# Altium PCB A313_3.PcbDoc (part 2 of 3)
Units mm, origin at the board's own origin, x right, y up, seen from the top; angles counter-clockwise.
Board outline 230.01 x 157.01 mm, 2 copper layers (Top Layer, Bottom Layer); 198 components, 173 nets, 1021 pads, 579 vias.
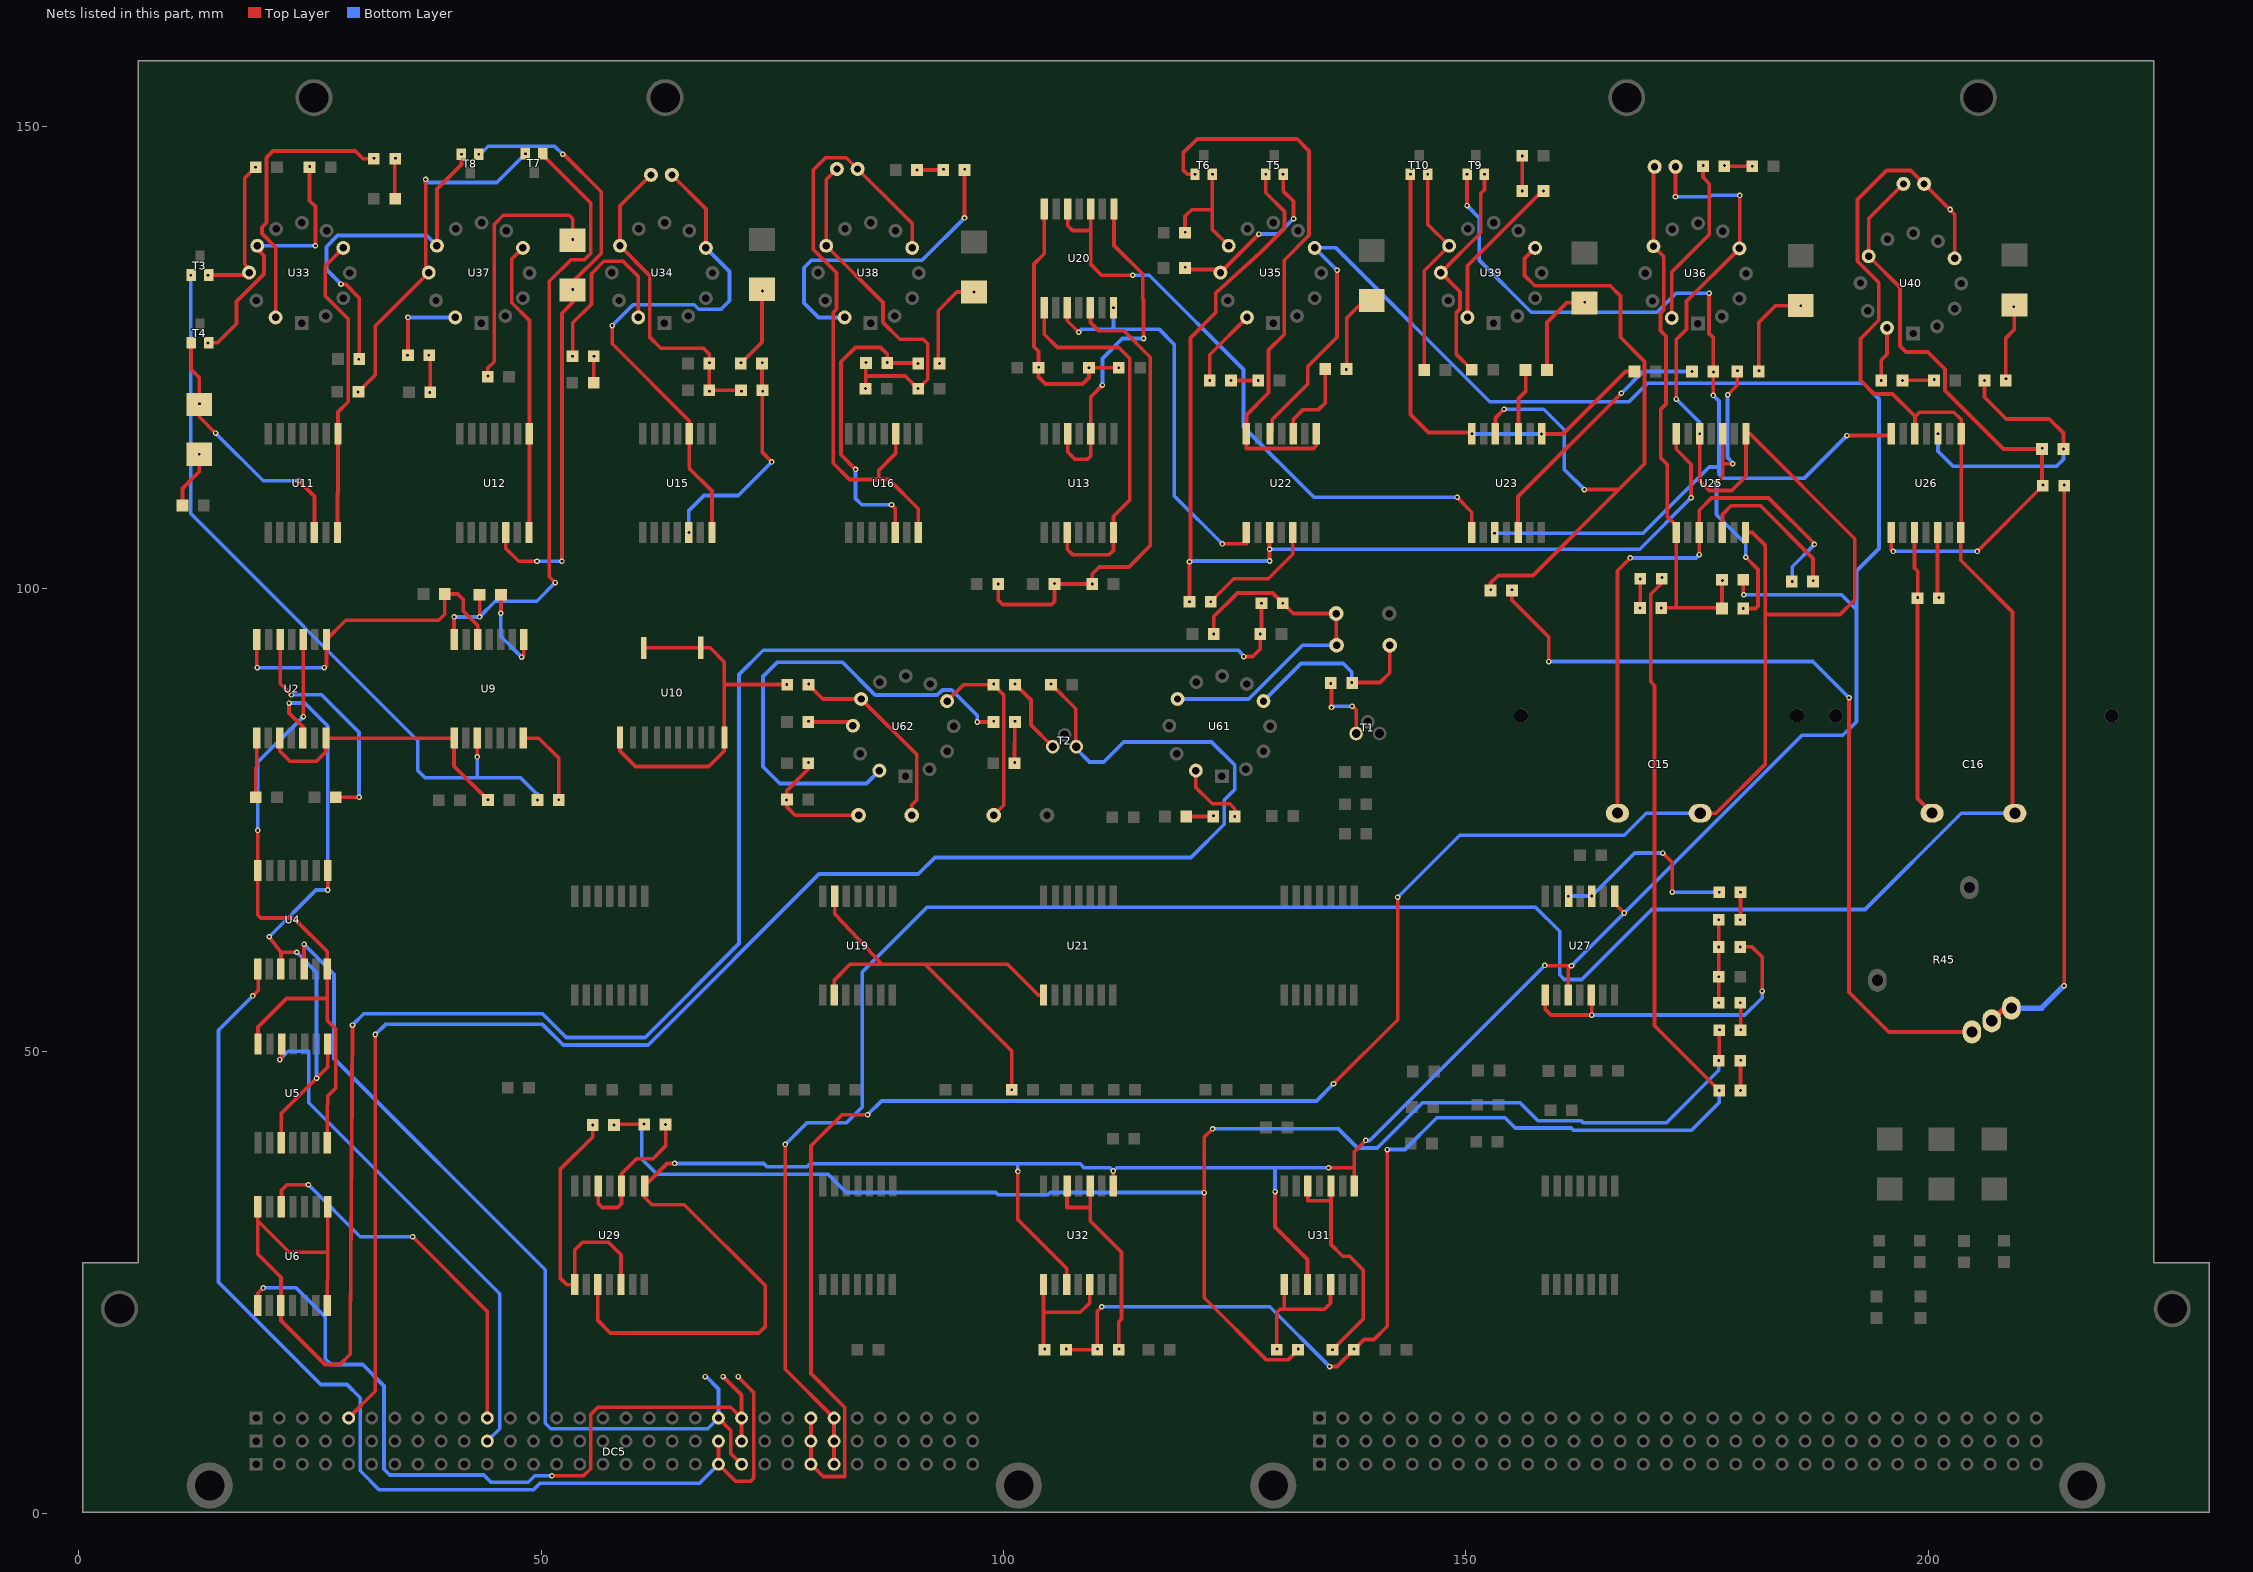
[diagram p2: the nets of this part, all layers, seen from the top]

## Via types
v1: diameter 0.6, hole 0.3, Top Layer to Bottom Layer, 579 vias

## Nets (pads, with @x,y where several pads share a name; then routed paths per layer and width w, separated by ;. In a path a pad name is that pad's centre, name@x,y a point inside that pad or via, vN(x,y) a via of type N, cw(c..) or ccw(c..) an arc to the next point about the centre after c; other vN are vias at no path point) (continued)
Bhod_c3b: DC5.B11 U5.12 | length 56.6
  Top Layer w0.4: v1(21.722,49.084) 21.925,49.287 U5.12@21.925,50.775
  Bottom Layer w0.4: v1(21.722,49.084) 22.637,49.999 24.872,49.999 24.872,44.417 45.521,23.768 45.521,9.171 DC5.B11@44.175,7.825
Bhod_c3rc: DC5.C11 U6.12 | length 41.5
  Top Layer w0.4: U6.12@21.907,33.175 21.907,34.957 22.5,35.55 v1(24.825,35.55) ; v1(36.099,29.933) 44.175,21.857 DC5.C11@44.175,10.325
  Bottom Layer w0.4: v1(24.825,35.55) 30.442,29.933 v1(36.099,29.933)
Bhod_rc: DC5.B22 DC5.C22 U6.1 | length 85.6
  Top Layer w0.4: U6.1@19.357,22.5 19.357,23.808 v1(19.944,24.396) ; v1(51.161,4.076) 54.59,4.076 55.352,4.838 55.352,10.705 56.139,11.492 70.508,11.492 DC5.C22@71.675,10.325 ; v1(69.675,14.8) 71.675,12.8 DC5.C22@71.675,10.325 ; DC5.B22@71.675,7.825 DC5.C22@71.675,10.325
  Bottom Layer w0.4: v1(19.944,24.396) 23.5,24.396 26.65,21.246 26.65,16.738 27.285,16.103 30.697,16.103 33,13.8 33,4.787 33.635,4.152 43.802,4.152 44.582,3.371 48.596,3.371 49.3,4.076 v1(51.161,4.076)
Bhoda: DC5.A21 DC5.B21 U4.1 | length 123.7
  Top Layer w0.4: v1(18.801,55.968) 19.398,56.565 19.398,57.817 19.357,57.817 U4.1@19.357,58.875 ; DC5.B21@69.175,7.825 DC5.A21@69.175,5.325 71,3.5 72.675,3.5 73,3.825 73,13.075 v1@71.325,14.75
  Bottom Layer w0.4: v1(18.801,55.968) 15.1,52.266 15.1,25.01 26.162,13.949 28.994,13.949 30.435,12.508 30.435,4.609 32.473,2.571 49.174,2.571 49.874,3.271 67.121,3.271 DC5.A21@69.175,5.325
  other v1: 71.325,14.8
Bhodb: DC5.A22 DC5.C21 U4.5 | length 95.8
  Top Layer w0.4: U4.5@24.357,58.875 v1(24.357,61.556) ; DC5.C21@69.175,10.325 70.516,8.984 70.516,6.484 DC5.A22@71.675,5.325
  Bottom Layer w0.4: v1(24.357,61.556) 27.591,58.321 27.591,49.206 50.45,26.347 50.45,9.75 51.044,9.156 68.006,9.156 DC5.C21@69.175,10.325 69.175,13.475 v1@67.85,14.8
  other v1: 67.75,14.8
int.a: C15.2 C34.1 DC5.A25 DC5.B25 DC5.C25 U25.7 U25.8 U25.12 U36.5 | length 290.1
  Top Layer w0.4: DC5.C25@79.175,10.325 DC5.A25@79.175,5.325 80.501,3.999 82.835,3.999 82.835,11.467 79.175,15.127 79.175,39.76 82.53,43.115 v1(85.299,43.115) ; v1(135.692,46.468) 142.626,53.402 v1(142.626,66.636) ; v1(172.675,142.4) C34.1@172.675,145.65 ; v1(172.75,120.525) 172.75,126.96 173.868,128.078 173.868,131.093 U36.5@179.593,136.818 179.55,136.86 179.625,136.935 v1(179.625,142.55) ; v1(175.3,116.775) 175.3,111.67 176.341,110.629 178.754,110.629 180.3,112.175 U25.8@180.3,116.775 180.725,116.775 192.075,105.425 192.075,98.825 190.475,97.225 182.45,97.225 182.4,97.275 ; C15.2@175.35,75.725 177.069,75.725 182.4,81.056 182.4,97.275 ; U25.7@180.25,106.1 180.975,106.1 182.4,104.675 182.4,97.275
  Bottom Layer w0.4: v1(85.299,43.115) 86.797,44.614 133.838,44.614 v1(135.692,46.468) ; v1(142.626,66.636) 149.341,73.35 167.146,73.35 169.521,75.725 C15.2@175.35,75.725 ; v1(172.675,142.4) 176.4,142.4 176.55,142.55 v1(179.625,142.55) ; v1(172.75,120.525) 175.3,117.975 v1(175.3,116.775)
int.b: C16.2 C40.1 DC5.A26 DC5.B26 DC5.C26 U26.7 U26.8 U26.12 U40.5 | length 302.3
  Top Layer w0.4: v1(76.409,39.915) 76.409,15.591 DC5.C26@81.675,10.325 DC5.A26@81.675,5.325 ; U26.12@198.572,116.775 198.572,118.601 ; U40.5@202.865,135.743 202.865,140.51 198.126,145.249 195.509,145.249 192.36,142.099 192.36,135.428 194.671,133.117 194.671,129.049 192.68,127.058 192.68,122.545 194.15,121.075 196.152,121.075 198.572,118.655 198.572,118.601 ; C16.2@209.377,75.725 209.124,75.725 209.124,97.484 203.522,103.085 U26.7@203.522,106.1 203.572,106.15 203.572,118.303 202.775,119.1 199.072,119.1 198.572,118.601
  Bottom Layer w0.4: v1(76.409,39.915) 78.745,42.252 83.013,42.252 84.74,43.979 84.74,58.598 91.717,65.575 157.53,65.575 160.15,62.955 160.15,58.252 160.652,57.75 162.544,57.75 170.109,65.315 193.172,65.315 203.582,75.725 C16.2@209.377,75.725
  other v1: 202.375,141.025
ip: DC5.C5 R28.1 T2.3 | length 180.4
  Top Layer w0.4: DC5.C5@29.175,10.325 32.06,13.21 v1(32.06,51.802) ; v1(105.15,89.7) 107.825,87.025 107.825,82.975 T2.3@107.87,82.93
  Bottom Layer w0.4: v1(32.06,51.802) 33.152,52.894 50.157,52.894 52.379,50.672 61.576,50.672 80.055,69.15 90.785,69.15 92.588,70.954 120.279,70.954 123.875,74.55 123.875,77.175 125,78.3 125,80.935 122.51,83.425 113.01,83.425 110.851,81.266 109.3,81.266 107.87,82.696 T2.3@107.87,82.93
NetC4_2: C4.2 R5.2 U6.3 U6.7 U6.8 U6.14 | length 218.2
  Top Layer w0.4: U6.14@19.357,33.175 19.357,31.66 ; U6.7@26.857,22.5 26.907,27.849 26.907,28.25 ; U6.8@26.907,33.175 26.907,28.25 ; v1(29.596,52.818) 29.347,19.544 29.347,17.219 28.231,16.103 26.619,16.103 21.857,20.865 21.857,25.55 19.357,28.05 19.357,31.66 ; v1(125.995,92.677) 126.952,92.677 127.768,93.493 v1(127.768,95.125) ; v1(127.9,98.45) 127.9,95.257 C4.2@127.926,95.177 ; 19.357,31.66 22.767,28.25 26.907,28.25
  Bottom Layer w0.4: v1(29.596,52.818) 30.816,54.037 50.145,54.037 52.71,51.472 61.245,51.472 71.405,61.632 71.405,90.73 74.025,93.35 125.396,93.35 v1(125.995,92.677)
NetC5_2: C5.2 R7.1 | length 2.9
  Top Layer w0.4: C5.2@119.775,75.375 R7.1@122.693,75.375
  other v1: 122.718,75.45
NetC6_1: C6.1 T4.1 U11.5 | length 28.3
  Top Layer w0.4: T4.1@12.16,126.618 12.16,123.708 13.022,122.846 13.022,118.604 v1(14.788,116.838) ; v1(23.754,111.695) 25.475,109.975 U11.5@25.475,106.1
  Bottom Layer w0.4: v1(14.788,116.838) 19.931,111.695 v1(23.754,111.695)
  other v1: 13.047,120.025
NetC6_2: C6.2 R14.2 | length 6.3
  Top Layer w0.4: R14.2@11.2,109 11.2,110.857 13.022,112.679 v1(13.022,114.55)
NetC7_1: C7.1 T8.1 U12.5 | length 66.1
  Top Layer w0.4: v1(43.255,147) T8.1@43.255,147.35 ; U12.5@46.182,106.1 46.182,104.368 47.575,102.975 v1(49.55,102.975) ; v1(52.25,102.975) 52.25,129.802 53.4,130.952 53.4,132.375 53.4,133.172 56.5,136.272 56.5,142.932 52.357,147.075 v1@52.325,147.075
  Bottom Layer w0.4: v1(43.255,147) 43.4,147 44.275,147.875 51.45,147.875 v1(52.325,147) ; v1(49.55,102.975) v1(52.25,102.975)
  other v1: 53.425,132.375
NetC7_2: C7.2 R15.2 | length 28.1
  Top Layer w0.4: R15.2@44.225,122.95 44.225,123.875 44.913,124.563 44.913,139.413 45.9,140.4 53.025,140.4 53.4,140.025 C7.2@53.4,137.7
  other v1: 44.25,123.025 53.425,137.775
NetC8_2: C8.2 R18.1 | length 4.5
  Top Layer w0.4: C8.2@101.197,81.15 101.197,83.349 101.232,83.384 R18.1@101.232,85.6
  other v1: 101.222,81.225 101.257,85.675
NetC9_1: C9.1 R25.1 | length 9
  Top Layer w0.4: R25.1@71.583,124.375 73.875,126.667 C9.1@73.875,132.4
  other v1: 71.608,124.45 73.925,132.2
NetC10_1: C10.1 R27.1 | length 10.4
  Top Layer w0.4: R27.1@92.932,124.375 92.932,130.085 94.947,132.1 v1(96.8,132.1)
  other v1: 93.075,124.375
NetC11_1: C11.1 R40.1 | length 9
  Top Layer w0.4: R40.1@137.107,123.775 137.107,129.26 139.047,131.2 C11.1@139.825,131.2
  other v1: 137.075,123.725
NetC12_1: C12.1 R41.1 | length 10.1
  Top Layer w0.4: R41.1@158.775,123.675 158.775,128.815 160.885,130.925 C12.1@162.85,130.925
  other v1: 162.875,131
NetC13_1: C13.1 R48.2 | length 10.6
  Top Layer w0.4: R48.2@181.675,123.5 181.675,128.815 183.485,130.625 v1(186.225,130.625)
  other v1: 181.7,123.575
NetC14_1: C14.1 R50.2 | length 8.4
  Top Layer w0.4: R50.2@208.407,122.65 208.407,127.125 209.325,128.043 C14.1@209.325,130.7
  other v1: 208.432,122.725 209.25,130.5
NetC15_1: C15.1 R51.1 U25.3 | length 60.7
  Top Layer w0.4: C15.1@166.398,75.737 166.401,75.737 166.401,101.967 v1(167.772,103.339) ; v1(175.25,103.704) 175.25,108.5 176.579,109.829 182.748,109.829 v1@187.738,104.838 ; R51.1@185.25,100.8 v1(185.3,100.8)
  Bottom Layer w0.4: v1(167.772,103.339) 174.884,103.339 v1(175.25,103.704) ; v1(185.3,100.8) 185.3,102.4 v1(187.7,104.8)
NetC16_1: C16.1 R52.1 U26.3 | length 31.1
  Top Layer w0.4: U26.3@198.522,106.1 198.522,102.25 198.875,101.897 v1(198.875,99.05) ; R52.1@198.85,98.975 198.85,77.312 C16.1@200.425,75.737
NetC20_1: C20.1 T10.1 U23.8 U23.14 | length 53.8
  Top Layer w0.4: v1(144.01,144.825) 144.01,118.846 145.954,116.902 U23.14@150.65,116.902 ; U23.8@158.2,116.775 v1(158.2,116.75) 160.513,116.75 167.263,123.5 C20.1@168.243,123.5
  Bottom Layer w0.4: v1(150.675,116.775) 150.7,116.75 v1(158.2,116.75)
NetC22_1: C22.1 U2.3 U2.7 U9.1 | length 30.8
  Top Layer w0.4: U2.3@21.732,83.85 21.732,82.46 22.842,81.35 25.7,81.35 26.732,82.382 U2.7@26.732,83.85 U9.1@40.582,83.85 40.582,80.818 C22.1@44.25,77.15
  other v1: 44.25,77.2
NetC23_2: C23.2 U2.8 U2.14 U9.12 | length 36.8
  Top Layer w0.4: U2.14@19.232,94.525 19.232,91.529 v1(19.284,91.477) ; v1(26.548,91.477) 26.782,91.71 U2.8@26.782,94.525 28.857,96.6 38.925,96.6 39.582,97.257 C23.2@39.582,99.45 40.975,99.45 41.575,98.85 41.575,97.6 43.132,96.043 U9.12@43.132,94.525
  Bottom Layer w0.4: v1(19.284,91.477) v1(26.548,91.477)
NetC30_2: C30.2 R81.2 | length 4.1
  Top Layer w0.4: C30.2@34.157,142.725 R81.2@34.157,146.825
  other v1: 34.232,146.575
NetC31_1: C31.1 U15.7 U15.10 U34.5 | length 57.3
  Top Layer w0.4: v1(57.675,128.475) 57.675,126.505 66.025,118.155 66.025,113.025 68.475,110.575 U15.7@68.475,106.1 ; C31.1@64.125,144.775 67.818,141.082 U34.5@67.818,136.871
  Bottom Layer w0.4: v1(57.675,128.475) 59.92,130.72 66.555,130.72 67.043,130.232 69.457,130.232 70.375,131.15 70.375,134.314 U34.5@67.818,136.871
NetC31_2: C31.2 R24.2 R82.2 R83.2 U34.9 | length 34.8
  Top Layer w0.4: C31.2@61.875,144.775 58.521,141.421 U34.9@58.521,137.1 61.727,133.894 61.727,127.24 62.943,126.025 67.55,126.025 68.182,125.393 R82.2@68.182,121.475 R24.2@71.618,121.475
  other v1: 68.203,121.356 71.653,121.356 68.207,124.45
NetC32_2: C32.2 R84.2 | length 2.9
  Top Layer w0.4: C32.2@55.675,122.275 55.7,122.3 v1(55.7,125.15)
NetC33_2: C33.2 R87.2 | length 3
  Top Layer w0.4: v1(124.607,122.525) 127.418,122.525 C33.2@127.543,122.4
  other v1: 127.543,122.525
NetC34_2: C34.2 R43.2 R44.2 R47.1 U25.1 U36.9 | length 58.9
  Top Layer w0.4: C34.2@170.425,145.65 170.296,145.521 U36.9@170.296,137.046 171.405,135.938 171.405,130.136 171.049,129.78 171.049,127.926 171.659,127.316 171.659,120.001 171.096,119.439 171.096,114.134 171.786,113.444 171.786,107.808 172.75,106.844 172.75,98 172.7,97.95 ; R43.2@171.482,97.95 172.7,97.95 ; R44.2@177.7,100.975 177.7,97.875 177.65,97.925 174,97.95 172.7,97.95
  other v1: 171.147,97.925 177.75,100.9
NetC35_2: C35.2 R88.2 | length 3.1
  Top Layer w0.4: R88.2@177.95,145.7 180.818,145.7 C35.2@180.968,145.85
  other v1: 180.968,145.7 177.975,145.775
NetC36_2: C36.2 R102.2 | length 4.1
  Top Layer w0.4: R102.2@37.9,125.275 38.007,125.168 C36.2@38.007,121.25
  other v1: 37.945,121.227 37.838,125.252
NetC37_1: C37.1 U16.7 U16.10 U38.5 | length 69.2
  Top Layer w0.4: U16.10@88.335,116.775 88.335,114.625 86.525,112.815 86.525,111.822 ; U38.5@90.127,136.871 90.127,139.498 83.005,146.62 80.745,146.62 79.431,145.306 79.431,136.694 81.946,134.179 81.946,130.237 81.59,129.882 81.59,113.575 83.343,111.822 86.525,111.822 ; U16.7@90.785,106.1 90.785,108.648 87.61,111.822 86.525,111.822
NetC37_2: C37.2 R26.2 R109.2 R110.2 U38.9 | length 39.7
  Top Layer w0.4: C37.2@81.975,145.4 80.831,144.256 U38.9@80.831,137.1 86.975,130.956 86.975,128.815 88.79,127 91.3,127 91.8,126.5 91.8,122.657 R110.2@90.768,121.625 89.368,123.025 85.139,123.025 85.118,123.046 ; R109.2@85.075,121.625 85.118,121.668 85.118,123.046 ; R26.2@85.118,124.425 85.118,123.046
  other v1: 85.075,121.675 90.768,121.675 85.118,124.475
NetC38_2: C38.2 R103.2 | length 2.9
  Top Layer w0.4: v1(90.657,145.3) 93.425,145.3 v1(93.5,145.375)
NetC39_2: C39.2 R106.2 | length 3.9
  Top Layer w0.4: v1(156.093,143.025) 156.093,146.693 C39.2@156.225,146.825
  other v1: 156.093,146.825
NetC40_2: C40.2 R46.2 R49.1 U26.1 U40.9 | length 67.1
  Top Layer w0.4: U26.1@196.022,106.1 196.022,104.248 v1(196.22,104.05) ; C40.2@197.325,143.8 193.569,140.044 U40.9@193.569,135.972 196.957,132.584 196.957,126.275 197.617,125.615 199.954,125.615 201.834,123.735 201.834,121.449 208.158,115.125 R49.1@212.325,115.125 212.325,111.225 R46.2@212.4,111.15 v1(205.3,104.05)
  Bottom Layer w0.4: v1(196.22,104.05) v1(205.3,104.05)
  other v1: 212.425,111.225 212.35,115.2
NetC41_2: C41.2 R107.2 | length 3.4
  Top Layer w0.4: v1(197.232,122.525) 197.257,122.55 C41.2@200.625,122.55
  other v1: 200.65,122.625
NetD1_2: D1.2 D2.1 R5.1 R6.2 U61.9 | length 40.1
  Top Layer w0.4: v1(122.75,95.125) 122.75,97.001 125.304,99.554 129.103,99.554 131.332,97.325 D1.2@135.975,97.325 135.975,94.841 136.025,94.791 D2.1@136.025,93.9
  Bottom Layer w0.4: U61.9@118.824,88.086 126.52,88.086 132.334,93.9 D2.1@136.025,93.9
  other v1: 130.207,98.45
NetD2_2: D2.2 R8.2 U61.5 | length 20.3
  Top Layer w0.4: v1(137.675,89.875) 140.725,89.875 141.775,90.925 D2.2@141.775,93.9
  Bottom Layer w0.4: U61.5@128.12,87.857 132.188,91.925 136.75,91.925 137.675,91 v1(137.675,89.875)
NetD4_1: D4.1 R13.1 R16.2 | length 13.8
  Top Layer w0.4: R16.2@78.882,81.15 78.882,80.507 76.575,78.2 76.575,76.4 77.463,75.512 D4.1@84.325,75.511
  other v1: 76.525,77.15 78.907,81.225
NetD4_2: D4.2 R12.1 U62.9 | length 21.6
  Top Layer w0.4: R12.1@78.917,89.625 80.456,88.086 U62.9@84.6,88.086 90.607,82.079 90.607,77.151 90.075,76.619 D4.2@90.075,75.511
  other v1: 78.942,89.7
NetD7_2: D7.2 R23.2 U62.5 | length 20.8
  Top Layer w0.4: U62.5@93.896,87.857 95.664,89.625 R23.2@98.925,89.625 100.031,88.519 100.031,76.592 D7.2@98.95,75.511
  other v1: 98.95,89.7
NetR7_2: R7.2 U61.12 | length 7.8
  Top Layer w0.4: U61.12@120.805,80.339 120.805,78.52 122.575,76.75 124.475,76.75 125,76.225 v1(125,75.375)
NetR8_1: R8.1 T1.1 | length 8.1
  Top Layer w0.4: R8.1@135.4,89.825 135.475,89.75 v1(135.475,87.175) ; v1(137.7,87.3) 137.75,87.3 138.135,86.915 T1.1@138.135,84.35
  Bottom Layer w0.4: v1(135.475,87.175) 135.6,87.3 v1(137.7,87.3)
  other v1: 135.4,89.75
NetR10_1: R10.1 U9.7 | length 9.2
  Top Layer w0.4: U9.7@48.082,83.85 49.75,83.85 51.9,81.7 v1(51.9,77.2) ; R10.1@51.875,77.175 R10.1@51.9,77.15
NetR10_2: R10.2 T3.1 U9.3 | length 82.7
  Top Layer w0.4: v1(12.098,133.92) 12.137,133.92 T3.1@12.16,133.943 ; v1(43.082,81.823) U9.3@43.082,83.85
  Bottom Layer w0.4: v1(12.098,133.92) 12.098,108.137 36.658,83.578 36.658,80.352 37.445,79.564 43.075,79.564 ; v1(43.082,81.823) 43.082,79.571 43.075,79.564 ; 49.593,77.732 47.761,79.564 43.075,79.564
  Bottom Layer w0.6: v1(49.593,77.15) 49.593,77.732
NetR11_1: R11.1 T7.1 U9.14 | length 68.8
  Top Layer w0.4: U9.14@40.582,94.525 v1(40.582,96.963) ; v1(43.343,96.963) R11.1@43.343,99.35 ; T7.1@50.175,147.05 50.175,146.925 55.365,141.735 55.365,136.268 54.693,135.597 53.218,135.597 50.875,133.253 50.875,101.313 v1(51.517,100.672)
  Bottom Layer w0.4: v1(40.582,96.963) v1(43.343,96.963) 45.045,98.665 49.51,98.665 v1(51.517,100.672)
NetR11_2: R11.2 U9.8 | length 9.7
  Top Layer w0.4: v1(45.624,97.37) 45.65,97.396 R11.2@45.65,99.35 ; v1(47.884,92.62) 48.132,92.867 U9.8@48.132,94.525
  Bottom Layer w0.4: v1(45.624,97.37) 45.624,94.881 v1(47.884,92.62)
NetR12_2: R12.2 U10.9 U10.10 U10.11 U10.12 | length 45.4
  Top Layer w0.4: U10.10@58.518,83.915 58.518,82.46 60.203,80.775 68.122,80.775 69.807,82.46 69.807,89.6 ; U10.12@61.1,93.591 61.133,93.624 68.283,93.624 69.807,92.1 69.807,89.6 ; 71.15,89.625 R12.2@76.61,89.625 ; v1(76.55,89.65) 69.857,89.65 69.807,89.6
NetR17_2: R17.2 U62.10 | length 5
  Top Layer w0.4: R17.2@78.882,85.6 83.301,85.6 U62.10@83.711,85.19
  other v1: 78.907,85.675
NetR18_2: R18.2 U62.12 | length 52.8
  Top Layer w0.4: v1(97.158,85.6) R18.2@98.925,85.6
  Bottom Layer w0.4: U62.12@86.581,80.339 85.192,78.95 75.8,78.95 73.996,80.754 73.996,90.514 75.556,92.075 82.55,92.075 86.118,88.507 92.844,88.507 93.398,89.061 94.395,89.061 97.158,86.299 v1(97.158,85.6)
  other v1: 98.95,85.675
NetR19_1: R19.1 R20.2 R78.2 U20.5 | length 52.9
  Top Layer w0.4: v1(99.425,100.525) 99.425,98.8 99.925,98.3 105.2,98.3 105.507,98.607 105.507,100.625 105.607,100.525 v1(109.6,100.525) 109.6,101.6 110.362,102.362 113.562,102.362 115.88,104.68 115.88,125.056 113.01,127.926 110.264,127.926 109.4,128.79 U20.5@109.4,130.4
  other v1: 105.507,100.575
NetR21_1: R21.1 R22.2 R77.2 U20.14 | length 29.3
  Top Layer w0.4: U20.14@104.4,141.075 104.4,136.232 103.292,135.124 103.292,126.174 103.782,125.683 103.782,122.918 104.55,122.15 108.55,122.15 109.257,122.857 v1(109.257,123.9) v1(112.475,123.9) ; R21.1@112.35,123.95 R21.1@112.475,124.075
  other v1: 103.807,123.975
NetR23_1: R23.1 T2.1 | length 8.5
  Top Layer w0.4: v1(101.257,89.7) 102.975,87.982 102.975,85.285 T2.1@105.33,82.93
NetR24_1: R24.1 R25.2 U15.5 | length 24.6
  Top Layer w0.4: R25.2@73.89,124.375 73.89,121.51 R24.1@73.925,121.475 73.925,114.738 v1(74.935,113.727)
  Bottom Layer w0.4: v1(65.975,106.1) 65.975,108.47 67.6,110.095 71.303,110.095 v1(74.935,113.727)
  other v1: 73.954,121.356 73.915,124.45
NetR26_1: R26.1 R27.2 U16.5 | length 32.9
  Top Layer w0.4: v1(84.003,112.915) 82.428,114.489 82.428,124.548 83.981,126.1 86.709,126.1 87.425,125.384 R26.1@87.425,124.425 90.575,124.425 R27.2@90.625,124.375 ; v1(87.889,109.092) 88.285,108.697 U16.5@88.285,106.1
  Bottom Layer w0.4: v1(84.003,112.915) 84.003,109.765 84.676,109.092 v1(87.889,109.092)
  other v1: 90.768,124.375 87.425,124.475
NetR31_1: R31.1 U19.2 U19.13 U21.1 | length 53.1
  Top Layer w0.4: U19.2@81.71,56.075 81.71,57.695 83.411,59.397 86.848,59.397 ; U19.13@81.76,66.75 81.76,64.815 86.848,59.397 ; v1(100.893,45.825) 100.893,50.026 91.522,59.397 ; U21.1@104.325,56.075 103.75,56.075 100.428,59.397 91.522,59.397 ; 86.848,59.397 91.522,59.397
NetR35_1: R35.1 T5.1 U22.3 U25.14 | length 118.7
  Top Layer w0.4: v1(120.118,98.6) v1(120.118,102.932) 120.22,103.035 120.22,127.139 122.967,129.886 122.967,131.99 127.844,136.435 130.384,138.975 130.384,140.804 128.36,142.827 v1(128.36,144.825) ; v1(128.775,103.009) v1(128.775,104.279) U22.3@128.775,106.1 ; U25.14@172.75,116.775 172.75,115.083 174.364,113.469 v1(174.364,109.841)
  Bottom Layer w0.4: v1(120.118,102.932) 120.194,103.009 v1(128.775,103.009) ; v1(128.775,104.279) 168.801,104.279 v1(174.364,109.841)
NetR35_2: R35.2 U22.5 | length 13.3
  Top Layer w0.4: v1(122.425,98.6) 124.909,101.084 128.632,101.084 131.275,103.727 U22.5@131.275,106.1
NetR36_1: R36.1 T9.1 U23.3 U26.14 | length 106.1
  Top Layer w0.4: v1(150.135,141.448) v1(150.135,144.825) ; v1(153.1,106) 153.1,106.05 U23.3@153.15,106.1 ; v1(176.307,131.962) 176.307,127.621 176.757,127.171 v1(176.757,120.922) ; v1(191.217,116.572) 196.022,116.572 U26.14@196.022,116.775
  Bottom Layer w0.4: v1(150.135,141.448) 151.44,140.143 151.44,135.552 157.085,129.907 170.677,129.907 172.732,131.962 v1(176.307,131.962) ; v1(153.1,106) 169.164,106 176.332,113.169 177.374,113.169 ; v1(176.757,120.922) 177.374,120.306 177.374,113.169 ; v1(191.217,116.572) 186.619,111.975 177.831,111.975 177.374,112.432 177.374,113.169
  other v1: 176.782,123.45
NetR36_2: R36.2 U23.5 | length 28.3
  Top Layer w0.4: U23.5@155.65,106.1 155.65,109.975 v1(166.825,121.15)
  Bottom Layer w0.4: v1(166.825,121.15) 169.175,123.5 v1(174.45,123.5)
NetR40_2: R40.2 U22.10 | length 9.4
  Top Layer w0.4: U22.10@131.325,116.775 131.325,118.301 132.406,119.382 134.082,119.382 134.8,120.1 R40.2@134.8,123.775
NetR41_2: R41.2 U23.10 | length 7.2
  Top Layer w0.4: U23.10@155.7,116.775 155.7,120.575 156.468,121.343 R41.2@156.468,123.675
NetR43_1: R43.1 R53.2 | length 3.3
  Top Layer w0.4: R53.2@168.875,101.1 168.875,98.25 R43.1@169.2,97.925
  other v1: 168.84,97.925 168.875,101.075
NetR44_1: R44.1 U22.12 U27.3 U27.8 U29.3 U29.8 U31.3 U31.8 U32.3 U32.8 U35.5 | length 381.8
  Top Layer w0.4: U29.3@56.135,24.75 56.135,20.865 57.481,19.519 73.538,19.519 74.25,20.23 74.25,24.624 65.487,33.387 61.998,33.387 61.185,34.2 U29.8@61.185,35.425 63.619,37.859 v1(64.425,37.859) ; v1(101.555,36.994) 101.555,31.789 106.825,26.518 U32.3@106.825,24.75 ; U32.8@111.875,35.425 v1(111.875,37.038) ; U22.12@128.825,116.775 129.05,117 129.05,118.289 132.911,122.15 132.911,124.053 136.073,127.215 v1(136.073,134.448) ; v1(129.368,34.81) 129.368,30.985 132.875,27.477 U31.3@132.875,24.75 ; v1(135.158,37.4) 137.925,37.4 ; U31.8@137.925,35.425 137.925,37.4 ; v1(139.167,40.347) 137.925,39.105 137.925,37.4 ; v1(158.532,59.275) 158.576,59.231 v1(161.43,59.231) 161.075,58.876 U27.3@161.075,56.075 ; U27.8@166.125,66.75 166.125,65.953 v1(167.138,64.94) ; R44.1@180.007,100.975 180.007,99.393 v1(180.05,99.35)
  Bottom Layer w0.4: v1(64.425,37.859) 74.054,37.859 74.422,37.491 78.762,37.491 79.08,37.81 101.55,37.81 ; v1(101.555,36.994) 101.555,37.805 101.55,37.81 ; v1(129.368,34.81) 129.368,37.393 129.375,37.4 ; v1(135.158,37.4) 129.375,37.4 ; v1(136.073,134.448) U35.5@133.65,136.871 135.954,136.871 152.6,120.225 167.65,120.225 169.661,122.236 192.989,122.236 194.696,120.529 194.696,104.371 192.249,101.924 192.249,97.726 ; v1(139.167,40.347) 139.604,40.347 v1(158.532,59.275) ; v1(161.43,59.231) v1(167.138,64.94) 186.352,84.153 190.767,84.153 192.249,85.635 192.249,97.726 ; v1(180.05,99.35) 190.625,99.35 192.249,97.726 ; 101.55,37.81 108.288,37.81 108.698,37.4 111.512,37.4 v1(111.875,37.038) 112.238,37.4 129.375,37.4
NetR45_1: R45.1 R108.2 | length 90.4
  Top Layer w0.4: R108.2@154.982,99.825 154.982,98.768 158.959,94.791 v1(158.959,92.137) ; v1(191.445,88.226) 191.445,56.38 195.747,52.078 R45.1@204.742,52.078
  Bottom Layer w0.4: v1(158.959,92.137) 187.534,92.137 v1(191.445,88.226)
  other v1: 155.007,99.9
NetR45_2: R45.2 R45.3 R46.1 | length 63.5
  Top Layer w0.4: v1(214.707,57.081) R46.1@214.707,111.15
  Top Layer w0.6: R45.2@206.877,53.284 208.247,54.654 R45.3@209.012,54.654
  Bottom Layer w0.6: R45.3@209.012,54.654 212.28,54.654 v1(214.707,57.081)
  other v1: 214.732,111.225
NetR47_2: R47.2 R48.1 U25.10 | length 34.4
  Top Layer w0.4: v1(177.12,111.492) 177.8,112.173 177.8,113.4 ; U25.10@177.8,116.775 177.8,113.4 ; v1(178.339,120.992) 179.368,122.021 R48.1@179.368,123.5 ; v1@178.875,113.623 v1(178.875,113.525) 177.925,113.525 177.8,113.4 ; v1(180.007,97.875) 181.35,97.875 181.6,98.125 181.6,102.1 v1(180.275,103.425)
  Bottom Layer w0.4: v1(177.12,111.492) 177.12,108.012 180.275,104.857 v1(180.275,103.425) ; v1(178.339,120.992) 178.296,120.949 178.296,114.202 178.875,113.623 v1(178.875,113.525)
  other v1: 179.393,123.575
NetR49_2: R49.2 R50.1 U26.10 | length 31.4
  Top Layer w0.4: R50.1@206.1,122.65 206.1,120.725 208.449,118.376 213.1,118.376 214.632,116.843 v1(214.632,115.125)
  Bottom Layer w0.4: v1(201.072,116.775) 201.072,114.87 202.693,113.25 213.875,113.25 214.632,114.007 v1(214.632,115.125)
  other v1: 206.1,122.525
NetR51_2: R51.2 U25.5 | length 17
  Top Layer w0.4: U25.5@177.75,106.1 177.75,108.05 178.7,109 181.85,109 187.557,103.293 R51.2@187.557,100.8
  other v1: 187.582,100.875
NetR52_2: R52.2 U26.5 | length 7.2
  Top Layer w0.4: U26.5@201.022,106.1 201.022,99.11 R52.2@201.157,98.975
  other v1: 201.182,99.05
NetR53_1: R53.1 R96.2 R97.1 R98.1 R99.1 | length 162
  Top Layer w0.4: R98.1@106.75,17.7 R99.1@110.15,17.7 110.15,21.866 v1(110.637,22.353) ; v1(135.26,15.887) 136.069,15.887 138.99,18.808 140.058,18.808 141.509,20.259 v1(141.509,39.356) ; R53.1@171.182,101.1 171.182,100.607 170,99.425 170,89.939 170.414,89.525 170.414,52.736 v1(177.4,45.75)
  Bottom Layer w0.4: v1(110.637,22.353) 128.794,22.353 v1(135.26,15.887) ; v1(141.509,39.356) 143.414,39.356 146.862,42.804 154.241,42.804 155.357,41.688 161.415,41.688 161.651,41.452 174.402,41.452 177.4,44.45 v1(177.4,45.75)
  other v1: 106.775,17.775 110.175,17.775 137.907,17.775 171.225,101.225
NetR64_1: 
NetR75_2: R75.2 U2.1 | length 6.4
  Top Layer w0.4: R75.2@19.118,77.45 19.118,80.58 19.232,80.694 U2.1@19.232,83.85
NetR76_2: R76.2 U2.12 | length 25.1
  Top Layer w0.4: U2.12@21.782,94.525 21.782,89.741 v1(22.992,88.531) ; R76.2@27.782,77.45 v1(30.308,77.45)
  Bottom Layer w0.4: v1(22.992,88.531) 26.269,88.531 30.308,84.492 v1(30.308,77.45)
NetR79_1: R79.1 T3.3 U33.10 | length 16.6
  Top Layer w0.4: T3.3@14.04,133.943 18.149,133.943 U33.10@18.41,134.204 18.41,134.628 17.938,135.1 17.938,144.42 v1(19.118,145.6)
  other v1: 13.978,133.92
NetR80_1: R80.1 T4.3 U33.9 | length 28.9
  Top Layer w0.4: T4.3@14.04,126.618 14.993,126.618 17.05,128.675 17.05,131.075 20.025,134.05 20.025,136.014 19.299,136.74 U33.9@19.299,137.1 ; R80.1@24.943,145.6 24.943,141.978 25.583,141.337 v1(25.583,137.1)
  Bottom Layer w0.4: U33.9@19.299,137.1 v1(25.583,137.1)
  other v1: 13.978,126.595 24.968,145.675
NetR81_1: R81.1 U33.12 | length 30.4
  Top Layer w0.4: U33.12@21.28,129.353 21.28,136.945 19.8,138.425 19.8,139.101 20.3,139.601 20.3,146.65 21,147.35 29.9,147.35 30.75,146.5 R81.1@31.9,146.5
  other v1: 31.925,146.575
NetR84_1: R84.1 U34.12 | length 20.5
  Top Layer w0.4: R84.1@53.425,125.15 53.425,128.764 55.441,130.78 55.441,134.082 56.778,135.419 58.857,135.419 60.503,133.774 U34.12@60.503,129.353
  other v1: 53.393,125.15
NetR85_1: R85.1 T5.3 U35.10 | length 19.8
  Top Layer w0.4: R85.1@119.625,134.7 119.79,134.535 123.465,134.535 U35.10@123.465,134.204 v1(127.626,138.365) ; v1(130.24,144.825) 130.24,143.039 131.374,141.905 v1(131.374,140.016)
  Bottom Layer w0.4: v1(127.626,138.365) 129.723,138.365 v1(131.374,140.016)
  other v1: 119.65,134.775
NetR86_1: R86.1 T6.3 U35.9 | length 13.5
  Top Layer w0.4: R86.1@119.632,138.5 119.632,140.282 120.35,141 122.59,141 ; v1(122.59,144.825) 122.59,141 ; U35.9@124.354,137.1 122.59,138.864 122.59,141
  other v1: 119.657,138.575
NetR87_1: R87.1 U35.12 | length 8.5
  Top Layer w0.4: v1(122.3,122.525) 122.3,125.318 U35.12@126.335,129.353
NetR88_1: R88.1 U36.12 | length 18.4
  Top Layer w0.4: U36.12@172.278,129.299 172.278,134.26 176.332,138.315 176.332,143.811 175.643,144.5 R88.1@175.643,145.7
  other v1: 175.668,145.775
NetR89_1: R89.1 R90.1 R91.1 R160.1 | length 9
  Top Layer w0.4: v1(177.365,55.225) v1(177.365,58.05) v1(177.365,61.275) v1(177.365,64.2)
NetR90_2: R90.2 U27.1 U27.5 | length 35.5
  Top Layer w0.4: U27.1@158.575,56.075 158.575,54.55 159.225,53.9 v1(163.625,53.9) 163.625,56.025 U27.5@163.575,56.075 ; v1(179.672,61.275) 180.95,61.275 182.047,60.178 v1(182.047,56.501)
  Bottom Layer w0.4: v1(163.625,53.9) 180.175,53.9 182.047,55.772 v1(182.047,56.501)
NetR91_2: R91.2 R159.1 | length 3
  Top Layer w0.4: v1(179.672,64.2) 179.707,64.235 v1(179.707,67.175)
NetR92_1: R92.1 R160.2 | length 2.9
  Top Layer w0.4: v1(179.672,55.225) 179.732,55.165 v1(179.732,52.325)
NetR92_2: R92.2 R93.1 R94.1 R95.1 R161.1 | length 167
  Top Layer w0.4: v1(57.882,42) 57.882,42.099 R94.1@61.126,42.099 ; v1(61.125,42.125) R94.1@61.125,42.1 ; R94.1@61.15,42.075 R94.1@61.126,42.099 ; v1@122.611,41.501 122.52,41.501 121.722,40.702 v1(121.722,34.708) 121.722,23.342 128.453,16.611 130.768,16.611 R95.1@131.857,17.7 ; R161.1@177.365,48.935 v1(177.365,48.975) 177.4,49.01 R92.2@177.4,52.25
  Bottom Layer w0.4: v1(61.125,42.125) 60.875,41.875 60.875,38.329 62.513,36.691 81.016,36.691 82.999,34.708 99.146,34.708 99.37,34.483 104.835,34.483 105.06,34.708 v1(121.722,34.708) ; v1(122.611,41.591) 136.226,41.591 138.283,39.534 140.417,39.534 145.287,44.404 155.877,44.404 157.793,42.488 162.443,42.488 162.68,42.252 171.695,42.252 177.365,47.922 v1(177.365,48.975)
  other v1: 131.882,17.775 177.425,52.325
NetR93_2: R93.2 U29.1 U29.5 | length 32.8
  Top Layer w0.4: v1(55.575,42) 55.575,40.725 52.05,37.2 52.05,25.475 52.799,24.726 53.635,24.726 53.635,28.485 54.498,29.349 57.257,29.349 58.635,27.971 U29.5@58.635,24.75
NetR94_2: R94.2 U29.10 U29.12 | length 16.3
  Top Layer w0.4: U29.12@56.185,35.425 56.185,33.515 56.6,33.1 58.275,33.1 58.685,33.51 58.685,36.74 60.295,38.35 62.075,38.35 63.457,39.732 v1(63.457,42.075)
NetR95_2: R95.2 U31.1 U31.5 | length 15
  Top Layer w0.4: R95.2@129.55,17.7 129.55,21.725 129.9,22.075 130.4,22.075 ; U31.1@130.375,24.75 130.375,22.1 130.4,22.075 ; U31.5@135.375,24.75 135.375,22.746 134.704,22.075 130.4,22.075
  other v1: 129.575,17.775
NetR96_1: R96.1 R161.2 | length 3.2
  Top Layer w0.4: R161.2@179.672,48.975 179.707,48.94 v1(179.707,45.75)
  other v1: 179.732,49.015
NetR97_2: R97.2 U31.10 U31.12 | length 25.1
  Top Layer w0.4: U31.12@132.925,35.425 132.925,33.819 135.425,33.819 ; U31.10@135.425,35.425 135.425,33.819 ; v1(135.575,17.7) 138.908,21.033 138.908,26.336 137.413,27.831 136.681,27.831 135.425,29.086 135.425,33.819
NetR98_2: R98.2 U32.1 U32.5 | length 14.7
  Top Layer w0.4: U32.1@104.325,24.75 104.325,21.75 ; R98.2@104.443,17.7 104.325,17.818 R98.2@104.325,17.918 ; v1(104.468,17.775) R98.2@104.325,17.918 ; U32.5@109.325,24.75 109.325,22.775 108.3,21.75 104.325,21.75 ; R98.2@104.325,17.918 104.325,21.75
NetR99_2: R99.2 U32.10 U32.12 | length 24.1
  Top Layer w0.4: U32.12@106.875,35.425 106.875,33.1 109.375,33.1 ; U32.10@109.375,35.425 109.375,33.1 ; R99.2@112.457,17.7 112.457,20.719 112.758,21.019 112.758,28.242 109.375,31.625 109.375,33.1
  other v1: 112.482,17.775
NetR100_1: R100.1 T7.3 U37.10 | length 38.7
  Top Layer w0.4: R100.1@30.25,121.325 32.06,123.135 32.06,128.425 U37.10@37.839,134.204 37.521,134.522 v1@37.521,144.275 ; v1@37.45,144.325 v1(37.5,144.275)
  Bottom Layer w0.4: v1(37.5,144.275) 37.5,143.95 45.196,143.95 v1(48.295,147.05)
  other v1: 30.188,121.302
NetR101_1: R101.1 T8.3 U37.9 | length 37.8
  Top Layer w0.4: v1(28.352,132.955) 28.834,132.955 30.332,131.457 R101.1@30.332,124.85 ; U37.9@38.728,137.1 38.728,143.237 41.375,145.884 v1(41.375,147)
  Bottom Layer w0.4: v1(28.352,132.955) 26.777,134.53 26.777,137.008 27.982,138.213 37.615,138.213 U37.9@38.728,137.1
  other v1: 30.27,124.827
NetR102_1: R102.1 U37.12 | length 9.2
  Top Layer w0.4: R102.1@35.593,125.275 v1(35.593,129.353)
  Bottom Layer w0.4: v1(35.593,129.353) U37.12@40.709,129.353
  other v1: 35.531,125.252
NetR103_1: R103.1 U38.12 | length 33.6
  Top Layer w0.4: v1(95.782,140.111) R103.1@95.782,145.3
  Bottom Layer w0.4: U38.12@82.812,129.353 79.99,129.353 78.425,130.918 78.425,134.718 79.232,135.525 91.196,135.525 v1(95.782,140.111)
  other v1: 95.807,145.375
NetR104_1: R104.1 T9.3 U39.10 | length 24.8
  Top Layer w0.4: R104.1@150.65,123.7 148.951,125.399 148.951,129.829 149.378,130.256 149.378,132.134 U39.10@147.307,134.204 151.618,138.515 151.618,142.776 152.015,143.173 v1(152.015,144.825)
NetR105_1: R105.1 T10.3 U39.9 | length 23.2
  Top Layer w0.4: R105.1@145.5,123.675 145.5,134.404 U39.9@148.196,137.1 145.89,139.407 v1(145.89,144.825)
NetR106_1: R106.1 U39.12 | length 17.2
  Top Layer w0.4: U39.12@150.178,129.353 150.178,134.944 158.259,143.025 v1(158.4,143.025)
NetR107_1: R107.1 U40.12 | length 6
  Top Layer w0.4: v1(194.925,122.525) 194.925,124.75 195.55,125.375 U40.12@195.55,128.225
NetR108_1: R108.1 U23.12 U39.5 | length 78.4
  Top Layer w0.4: R108.1@152.675,99.825 152.675,100.625 153.497,101.447 157.264,101.447 166.551,110.734 ; U23.12@153.2,116.775 153.2,118.477 v1(154.14,119.417) ; U39.5@157.493,136.871 156.342,135.721 156.342,133.883 157.45,132.775 165.625,132.775 166.725,131.675 166.725,127.196 169.332,124.589 169.332,113.514 166.551,110.734 ; v1(162.823,110.734) 166.551,110.734
  Bottom Layer w0.4: v1(154.14,119.417) 158.433,119.417 160.652,117.198 160.652,112.905 v1(162.823,110.734)
  other v1: 152.7,99.9
NetR159_2: R159.2 U27.10 U27.12 | length 21.9
  Top Layer w0.4: v1(171.3,71.425) 172.328,70.397 v1(172.328,67.2)
  Bottom Layer w0.4: v1(161.075,66.75) 161.1,66.775 v1(163.625,66.775) 168.275,71.425 v1(171.3,71.425) ; v1(172.328,67.2) 172.353,67.175 v1(177.4,67.175)
NetT6_1: T6.1 U22.8 U22.14 | length 62.1
  Top Layer w0.4: v1(120.71,144.825) 119.9,144.825 119.425,145.3 119.425,147.125 120.95,148.65 131.758,148.65 133.051,147.357 133.051,138.227 130.358,135.534 130.358,127.52 128.656,125.818 128.656,121.195 126.275,118.814 U22.14@126.275,116.775 126.275,115.175 133.538,115.175 133.825,115.462 U22.8@133.825,116.775
NetU2_5: U2.5 U4.3 U4.8 U5.3 U5.8 | length 70.8
  Top Layer w0.4: v1(20.587,62.379) 21.857,60.692 ; U4.3@21.857,58.875 21.857,60.692 ; U5.3@21.875,40.1 21.875,43.243 v1(25.71,47.078) 26.925,48.293 U5.8@26.925,50.775 ; v1(22.738,87.642) 22.738,86.565 24.232,85.071 U2.5@24.232,83.85 ; v1(23.557,60.692) 21.857,60.692 ; v1(26.907,67.429) U4.8@26.907,69.55
  Bottom Layer w0.4: v1(20.587,62.379) 25.637,67.429 v1(26.907,67.429) 26.907,85.175 24.44,87.642 v1(22.738,87.642) ; v1(23.557,60.692) 25.71,58.539 v1(25.71,47.078)
NetU2_10: U2.10 U4.7 U4.14 U5.7 U5.14 | length 73
  Top Layer w0.4: v1(19.357,73.871) 19.357,64.734 19.688,64.403 23.219,64.403 26.857,60.765 26.857,55.692 ; U5.14@19.375,50.775 19.375,52.615 22.452,55.692 26.857,55.692 ; v1(24.282,86.188) U2.10@24.282,94.525 ; U5.7@26.875,40.1 26.875,44.128 26.917,44.17 26.917,45.157 27.779,46.019 27.779,52.386 26.857,53.309 26.857,55.692
  Bottom Layer w0.4: v1(19.357,73.871) 19.357,81.263 v1(24.282,86.188)
NetU11_7: U11.7 U11.8 U33.5 | length 33.1
  Top Layer w0.4: U11.7@27.975,106.1 27.975,110.325 28.025,110.375 28.025,119.116 29.139,120.23 29.139,129.189 26.65,131.678 26.65,134.926 U33.5@28.595,136.871
NetU12_7: U12.7 U12.8 U37.5 | length 32.1
  Top Layer w0.4: U37.5@48.025,136.871 46.818,135.664 46.818,130.94 48.732,129.026 48.732,106.15 U12.7@48.682,106.1
NetU13_3: U13.3 U13.7 U20.1 | length 41.9
  Top Layer w0.4: U20.1@104.4,130.4 104.4,127.545 105.845,126.1 112.474,126.1 113.65,124.924 113.65,109.595 111.9,107.845 111.9,104.156 111.444,103.7 107.474,103.7 106.9,104.274 U13.3@106.9,106.1
NetU13_10: U13.10 U13.12 U20.8 | length 36.7
  Top Layer w0.4: U13.12@106.95,116.775 106.95,114.809 107.759,114 109.05,114 109.45,114.4 109.45,120.785 v1(110.699,122.033) ; U20.8@111.95,141.075 111.95,137.139 115.05,134.039 115.05,131.325 115.15,131.225 v1(115.15,127.075)
  Bottom Layer w0.4: v1(110.699,122.033) 110.699,124.924 112.85,127.075 v1(115.15,127.075)
NetU20_3: U20.3 U20.7 U22.1 | length 44.2
  Top Layer w0.4: U20.3@106.9,130.4 106.9,128.993 v1(108.145,127.748) ; v1(111.9,130.4) U20.7@111.9,130.415 ; v1(123.653,104.863) 126.275,104.863 U22.1@126.275,106.1
  Bottom Layer w0.4: v1(108.145,127.748) 108.485,128.089 111.925,128.089 ; v1(111.9,130.4) 111.9,128.114 111.925,128.089 ; v1(123.653,104.863) 118.471,110.044 118.471,126.438 116.82,128.089 111.925,128.089
NetU20_10: U20.10 U20.12 U23.1 | length 68.7
  Top Layer w0.4: U20.12@106.95,141.075 106.95,139.269 107.469,138.75 109.4,138.75 109.45,138.8 ; U20.10@109.45,141.075 109.45,138.8 ; v1(113.975,133.92) 110.593,133.92 109.45,135.063 109.45,138.8 ; v1(149.053,109.892) 150.65,108.295 U23.1@150.65,106.1
  Bottom Layer w0.4: v1(113.975,133.92) 115.755,133.92 125.964,123.711 125.964,117.512 133.584,109.892 v1(149.053,109.892)